# Altium PCB PCB_TDS.PcbDoc
Units mm, origin at the board's own origin, x right, y up, seen from the top; angles counter-clockwise.
Board outline 12.37 x 15.65 mm, 2 copper layers (Top Layer, Bottom Layer), stack 1.448 mm thick; 10 components, 8 nets, 26 pads, 47 vias.
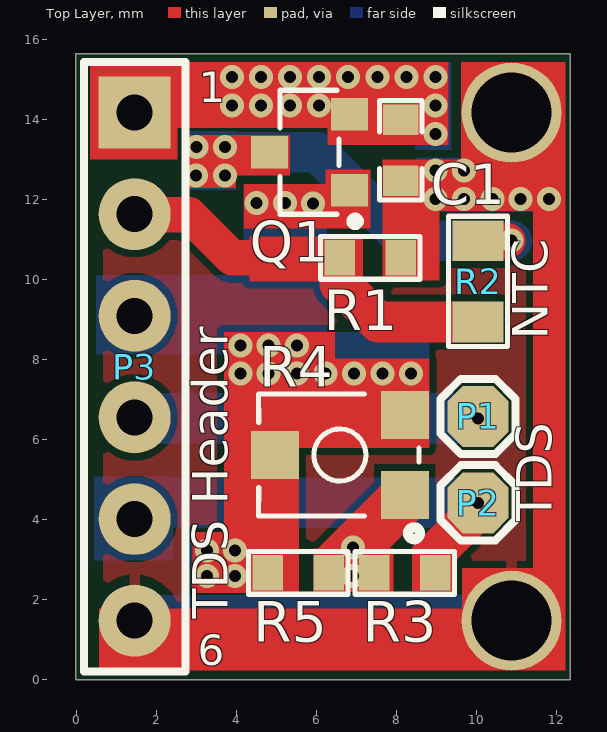
[diagram p0: Top Layer view]
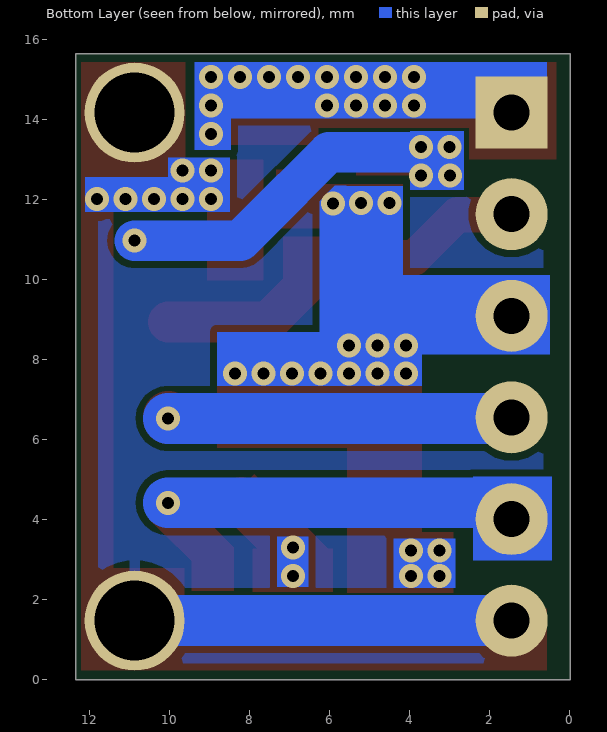
[diagram p1: Bottom Layer view, seen from below]
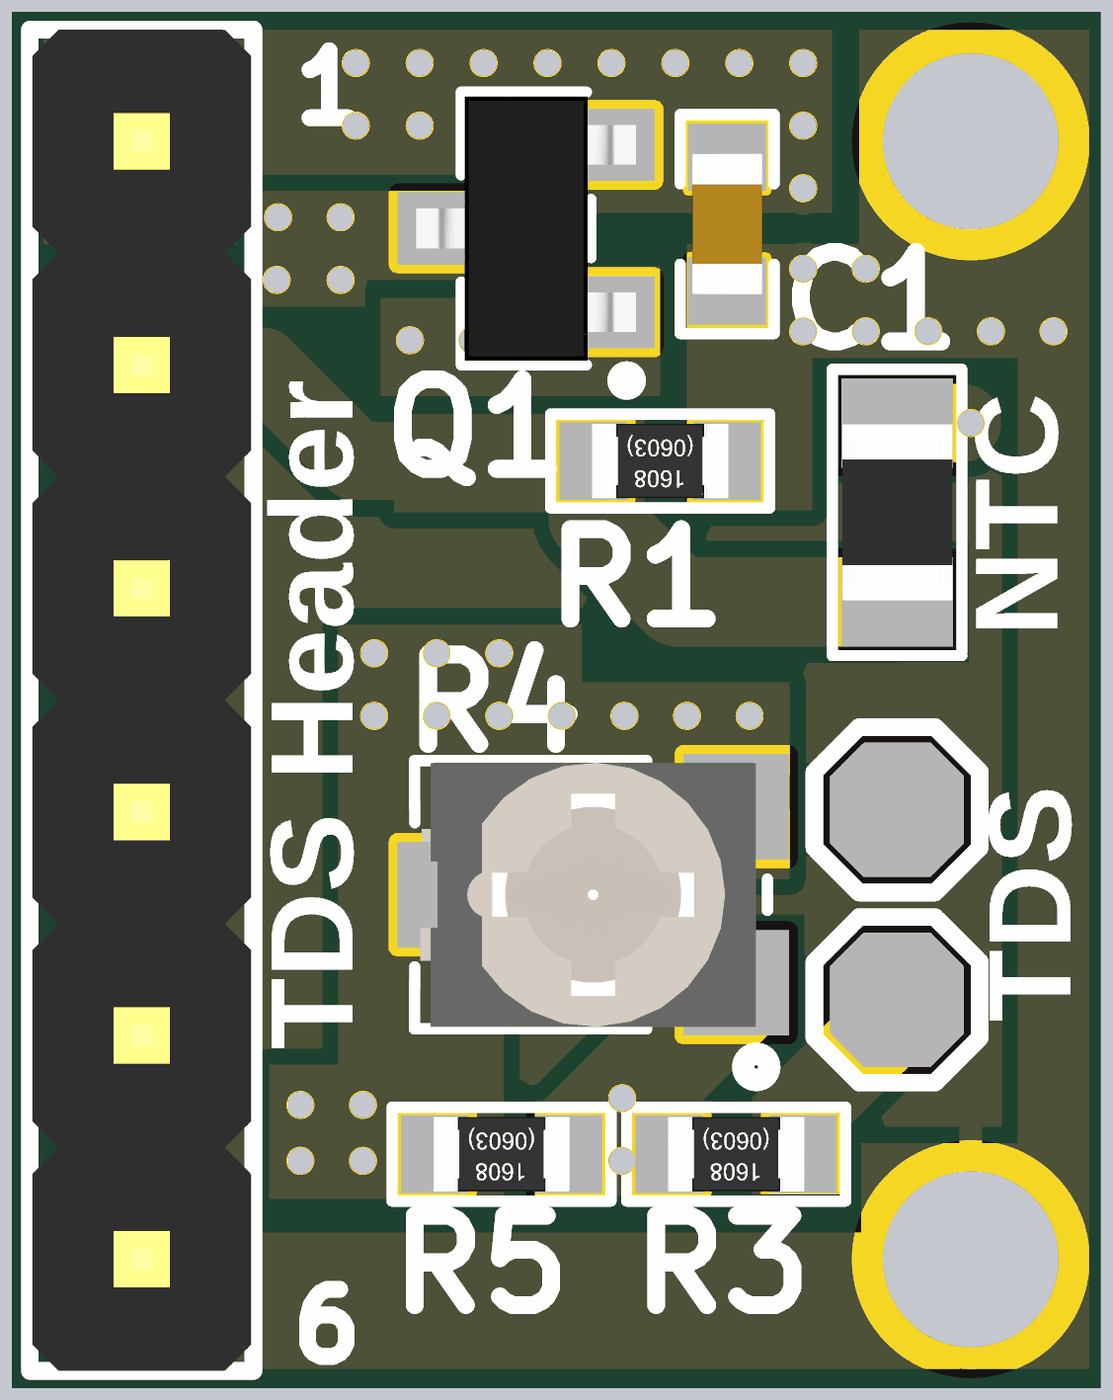
[diagram p2: 3D render of the assembled board from above, using the file's embedded part models]

## Layer stack, top to bottom
Top Solder: solder mask 0.0762, Solder Resist, Dk 3.5
Top Layer: signal copper 0.254
Dielectric 1: dielectric 0.9398, FR-4, Dk 4.8
Bottom Layer: signal copper 0.254
Bottom Solder: solder mask 0.0762, Solder Resist, Dk 3.5

## Board outline
-0.025,0 -0.025,15.646 12.344,15.646 12.344,0

## Design rules (kind name [scope] priority, off if disabled: settings)
Clearance [All] p1: gap=0.178 ignorepadtopadclearanceinfootprint=FALSE
ComponentClearance [All] p1: gap=0 collisioncheckmode=3 verticalgap=0 showdistances=FALSE
HoleSize [All] p1: absolutevalues=TRUE maxlimit=25.4 minlimit=0.025 maxpercent=80.000 minpercent=20.000
HoleToHoleClearance [All] p1: gap=0 allowstackedmicrovias=TRUE
MinimumSolderMaskSliver [All] p1: minsoldermaskwidth=0
PolygonConnect [All] p1: connectstyle=Relief reliefconductorwidth=0.254 reliefentries=4 polygonreliefangle="90 Angle" airgapwidth=0.254
RoutingVias [All] p1: holewidth=0.3 width=0.6 viastyle="Through Hole" minholewidth=0.3 minwidth=0.6 maxholewidth=0.3 maxwidth=0.6
SilkToSilkClearance [All] p1: silktosilkclearance=0
SilkToSolderMaskClearance [IsPad] p1: minsilkscreentomaskgap=0 clearancetoexposedcopper=TRUE
SolderMaskExpansion [All] p1: expansion=0.102 istentingtop=FALSE
Width [All] p1: maxlimit=1.27 minlimit=0.254 preferedwidth=0.508 minimp=50.000000 maximp=50.000000 favimp=50.000000
24 further rules are at their usual default settings.

## Components (designator, comment, footprint, x,y, rotation, side; value= is the part's Value field where it differs from the comment)
C1 "0.1uF" Cap0603 8.103,13.233 r270 top locked
P1 "Test Point" "TEST POINT" 10.033,6.579 r0 top
P2 "Test Point" "TEST POINT" 10.033,4.42 r0 top
P3 "61300611121" HDR1X6 1.448,14.173 r270 top locked
Q1 "IRLML6402TRPBF" SOT-23 5.817,13.183 r90 top locked
R1 "15K" RES-0603 7.341,10.541 r0 top
R2 "10k" NCP21XV103J03RA 10.033,9.957 r90 top
R3 "1K" RES-0603 8.204,2.667 r0 top
R4 "2K" VG039NCHXTB202 6.579,5.613 r90 top locked
R5 "1K" RES-0603 5.537,2.667 r0 top

## Footprints (in the part's own frame and the unit in brackets; to place one, negate y for a bottom-side part, rotate by r counter-clockwise, add the part's x,y. Pads: shape width x height; smd on the part's side, far side on the other; paste and mask are expansions set on the pad)
Cap0603 [mil]
  rect 30x35 smd mask+2.36: 1(-30,0) 2(30,0)
  silkscreen extent -49,-21 49,21, body extent -32,-16 31,16, height 34
HDR1X6 [mm] "Connector; Header; 6 Position"
  rect 1.8x1.8 hole 0.9: 1(0,0)
  round 1.8 hole 0.9: 2(2.54,0) 3(5.08,0) 4(7.62,0) 5(10.16,0) 6(12.7,0)
  silkscreen extent -1.27,-1.27 13.97,1.27, body extent -1.27,-1.24 13.97,1.25, height 8.54
NCP21XV103J03RA [mil]
  rect 40x50 smd: 1(-40,0) 2(40,0)
  silkscreen extent -64,-29 64,29, body extent -39,-25 39,24, height 24
RES-0603 [mil]
  rect 30x35 smd: 1(-30,0) 2(30,0)
  silkscreen extent -49,-21 49,21, body extent -31,-17 31,17, height 18
SOT-23 [mm] "TRANS NPN 40V 0.6A SOT23"
  rect 0.82x0.92 smd: 1(-0.95,-1) 2(0.95,-1) 3(0,1)
  silkscreen extent -1.82,-1.23 1.55,0.74, body extent -1.5,-1.25 1.5,1.25, height 1.1
"TEST POINT" [mil]
  oct 60x60 smd: 1(0,0)
  silkscreen extent -37,-37 37,37
VG039NCHXTB202 [mm]
  rect 1.2x1.2 smd: 1(-1,-1.625) 2(0,1.625) 3(1,-1.625)
  silkscreen extent -2.1,-2 1.52,2.03, body extent -1.5,-1.95 1.5,1.96, height 1.1

## Part data
C1: library part CC0603ZRY5V9BB104, "CAP CER 0.1UF 50V Y5V 0603", Capacitance=100nF, Case Code (Imperial)=0603, Case Code (Metric)=1608, Dielectric=Y5V, Manufacturer=Yageo, Max Operating Temperature=85°C, Min Operating Temperature=-30°C, Package Quantity=1, Supplier Part Number 1=311-1343-1-ND, Tolerance=80%, Voltage=50V, Case/Package=0603, ComponentLink1Description=http://www.yageo.com/documents/recent/UPY-GPHC_Y5V_6.3V-to-50V_8.pdf?src-supplier=Digi-Key, ComponentLink1URL=http://www.yageo.com/documents/recent/UPY-GPHC_Y5V_6.3V-to-50V_8.pdf?src-supplier=Digi-Key, ComponentLink2Description=http://www.yageo.com/documents/recent/UPY-GPHC_Y5V_6.3V-to-50V_5.pdf?src-supplier=Avnet+Europe, ComponentLink2URL=http://www.yageo.com/documents/recent/UPY-GPHC_Y5V_6.3V-to-50V_5.pdf?src-supplier=Avnet+Europe, ComponentLink3Description=https://www.verical.com/server-webapp/html/getDatasheet?partID=403611&src-supplier=Verical, ComponentLink3URL=https://www.verical.com/server-webapp/html/getDatasheet?partID=403611&src-supplier=Verical, ComponentLink4Description=http://www.mouser.com/ds/2/447/Yageo_UPY-GP_NP0_16V-to-50V_9-358835.pdf?src-supplier=Mouser, ComponentLink4URL=http://www.mouser.com/ds/2/447/Yageo_UPY-GP_NP0_16V-to-50V_9-358835.pdf?src-supplier=Mouser, ComponentLink5Description=http://www.farnell.com/datasheets/1132289.pdf?src-supplier=Element14, ComponentLink5URL=http://www.farnell.com/datasheets/1132289.pdf?src-supplier=Element14, Composition=Ceramic, Depth=0.8mm, Halogen Free="Halogen Free", Height=0.8mm, Lead Free="Lead Free", Length=1.6mm, Manufacturer Part Number=CC0603ZRY5V9BB104, Mount="Surface Mount", Number of Pins=2, Packaging="Tape and Reel", Pricing 1="1=0.1, 10=0.075, 100=0.0334, 500=0.02386, 1000=0.01874 (USD)", Radiation Hardening=No, REACH SVHC="No SVHC", Stock 1=15000880, Supplier 1=Digi-Key, Termination=SMD/SMT, Thickness=0.035inch, Voltage Rating=50V, Voltage Rating (DC)=50V, Width=0.031inch
P1 P2: library part "TEST POINT", "Test Point ON"
P3: library part "Header 1x6", "CONN HEADER VERT 6POS 2.54MM", Color=Black, Current Rating=3A, Manufacturer="Wurth Electronics", Max Operating Temperature=125°C, Min Operating Temperature=-40°C, Supplier Part Number 1=732-5319-ND, Voltage Rating=250V, ComponentLink1Description=http://www.farnell.com/cad/1737268.pdf?src-supplier=Element14, ComponentLink1URL=http://www.farnell.com/cad/1737268.pdf?src-supplier=Element14, ComponentLink2Description=https://katalog.we-online.de/em/datasheet/6130xx11121.pdf?src-supplier=Digi-Key, ComponentLink2URL=https://katalog.we-online.de/em/datasheet/6130xx11121.pdf?src-supplier=Digi-Key, ComponentLink3Description=http://www.mouser.com/ds/2/445/6130xx11121-538006.pdf?src-supplier=Mouser, ComponentLink3URL=http://www.mouser.com/ds/2/445/6130xx11121-538006.pdf?src-supplier=Mouser, Connector Type="Male Pin", Contact Gender=Male, Contact Material="Copper Alloy,Copper", Contact Mating Length=0.236inch, Contact Plating=Gold, Gender=Male, Housing Material=PBT, Lead Free="Lead Free", Manufacturer Part Number=61300611121, Mount="Through Hole", Number of Contacts=6, Number of Positions=6, Number of Rows=1, Packaging=Bulk, Pitch=0.1inch, Pricing 1="1=0.33, 10=0.279, 25=0.232, 50=0.194, 100=0.176, 1000=0.16 (USD)", REACH SVHC=Unknown, Stock 1=14573, Supplier 1=Digi-Key, Termination="Through Hole"
Q1: "MOSFET P-CH 20V 3.7A SOT23", Case/Package=SOT-23, Continuous Drain Current (ID)=3.7A, Current Rating=-3.7A, Drain to Source Breakdown Voltage=-20V, Drain to Source Resistance=65mR, Drain to Source Voltage (Vdss)=20V, Gate to Source Voltage (Vgs)=12V, Input Capacitance=633pF, Manufacturer="International Rectifier", Max Operating Temperature=150°C, Max Power Dissipation=1.3W, Min Operating Temperature=-55°C, Package Quantity=1, Supplier Part Number 1=06X2796, Threshold Voltage=-550mV, Category=MOSFETs, ComponentLink1Description=https://datasheet.ciiva.com/7799/13209-7799017.pdf?src-supplier=Element14, ComponentLink1URL=https://datasheet.ciiva.com/7799/13209-7799017.pdf?src-supplier=Element14, ComponentLink2Description=https://datasheet.ciiva.com/34302/1563729-34302500.pdf?src-supplier=Jameco, ComponentLink2URL=https://datasheet.ciiva.com/34302/1563729-34302500.pdf?src-supplier=Jameco, ComponentLink3Description=https://datasheet.ciiva.com/28515/irlml6402pbf-28515795.pdf?src-supplier=Element14, ComponentLink3URL=https://datasheet.ciiva.com/28515/irlml6402pbf-28515795.pdf?src-supplier=Element14, ComponentLink4Description=https://datasheet.ciiva.com/7333/irlml6402-7333200.pdf?src-supplier=Newark, ComponentLink4URL=https://datasheet.ciiva.com/7333/irlml6402-7333200.pdf?src-supplier=Newark, ComponentLink5Description=https://datasheet.ciiva.com/29326/162833-da-01-en-irlml-6402tr-29326798.pdf?src-supplier=Conrad, ComponentLink5URL=https://datasheet.ciiva.com/29326/162833-da-01-en-irlml-6402tr-29326798.pdf?src-supplier=Conrad, ComponentLink6Description=https://datasheet.ciiva.com/7799/13209-7799018.pdf?src-supplier=Element14, ComponentLink6URL=https://datasheet.ciiva.com/7799/13209-7799018.pdf?src-supplier=Element14, ComponentLink7Description=https://datasheet.ciiva.com/936/irlml6402pbf-936987.pdf?src-supplier=Digi-Key, ComponentLink7URL=https://datasheet.ciiva.com/936/irlml6402pbf-936987.pdf?src-supplier=Digi-Key, ComponentLink8Description=https://datasheet.ciiva.com/936/irlml6402pbf-936988.pdf?src-supplier=Digi-Key, ComponentLink8URL=https://datasheet.ciiva.com/936/irlml6402pbf-936988.pdf?src-supplier=Digi-Key, ComponentLink9Description=https://datasheet.ciiva.com/16311/irlml6402pbf-16311535.pdf?src-supplier=Future+Electronics, ComponentLink9URL=https://datasheet.ciiva.com/16311/irlml6402pbf-16311535.pdf?src-supplier=Future+Electronics, Drain-source On Resistance-Max=65mR, Dual Supply Voltage=-20V, Element Configuration=Single, Fall Time=381ns, Height=1.02mm, Lead Free="Lead Free", Length=3.04mm, Manufacturer Part Number=IRLML6402TRPBF, Mount="Surface Mount", Nominal Vgs=-550mV, Number of Elements=1, Number of Pins=3, On-State Resistance=65mR, Packaging="Tape and Reel", Power Dissipation=1.3W, Radiation Hardening=No, Rds On Max=65mR, REACH SVHC="No SVHC", Rise Time=48ns, RoHS=Yes, RoHS Compliant=Yes, Series=HEXFET®, Supplier 1=Newark, Termination=SMD/SMT, Turn-Off Delay Time=588ns, Turn-On Delay Time=350ns, Voltage Rating (DC)=-20V, Width=1.4mm
R1: library part RC0603FR-0715KL, "RES SMD 15K OHM 1% 1/10W 0603", Case Code (Imperial)=0603, Case Code (Metric)=1608, Manufacturer=Yageo, Max Operating Temperature=155°C, Max Power Dissipation=100mW, Min Operating Temperature=-55°C, Package Quantity=1, Resistance=15kR, Supplier Part Number 1=311-15.0KHRCT-ND, Temperature Coefficient=100ppm/°C, Tolerance=1%, Voltage Rating=50V, Case/Package=0603, ComponentLink1Description=http://www.yageo.com/documents/recent/PYu-RC_Group_51_RoHS_L_10.pdf?src-supplier=Digi-Key, ComponentLink1URL=http://www.yageo.com/documents/recent/PYu-RC_Group_51_RoHS_L_10.pdf?src-supplier=Digi-Key, ComponentLink2Description=http://www.yageo.com/documents/recent/PYu-RC_Group_51_RoHS_L_9.pdf?src-supplier=Digi-Key, ComponentLink2URL=http://www.yageo.com/documents/recent/PYu-RC_Group_51_RoHS_L_9.pdf?src-supplier=Digi-Key, ComponentLink3Description=https://www.verical.com/server-webapp/html/getDatasheet?partID=327895&src-supplier=Verical, ComponentLink3URL=https://www.verical.com/server-webapp/html/getDatasheet?partID=327895&src-supplier=Verical, Composition="Thick Film", Depth=0.8mm, Features="Moisture Resistant", Height=0.022inch, Lead Free="Lead Free", Length=1.6mm, Manufacturer Part Number=RC0603FR-0715KL, Military Standard=Not, Number of Pins=2, Number of Terminations=2, Packaging="Tape and Reel", Power Rating=100mW, Pricing 1="1=0.1, 10=0.023, 100=0.0094, 1000=0.00421, 2500=0.00366 (USD)", REACH SVHC=Unknown, Stock 1=6469942, Supplier 1=Digi-Key, Termination=SMD/SMT, Voltage Rating (DC)=50V, Width=0.031inch
R2: library part NCP21XV103J03RA, "THERMISTOR NTC 10KOHM 3900K 0805", Case Code (Imperial)=0805, Case Code (Metric)=2012, Current Rating=440uA, Manufacturer=Murata, Max Operating Temperature=125°C, Max Power Dissipation=200mW, Min Operating Temperature=-40°C, Package Quantity=4000, Resistance=10kR, Resistance Tolerance=5%, Accuracy=3%, Case/Package=0805, Category=Thermistors, ComponentLink1Description=https://datasheet.ciiva.com/11822/0900766b807f1e39-11822071.pdf?src-supplier=RSComponents, ComponentLink1URL=https://datasheet.ciiva.com/11822/0900766b807f1e39-11822071.pdf?src-supplier=RSComponents, ComponentLink2Description=https://datasheet.ciiva.com/2848/r44e-2848542.pdf?src-supplier=Digi-Key, ComponentLink2URL=https://datasheet.ciiva.com/2848/r44e-2848542.pdf?src-supplier=Digi-Key, ComponentLink3Description=https://datasheet.ciiva.com/2848/r44e-2848541.pdf?src-supplier=Digi-Key, ComponentLink3URL=https://datasheet.ciiva.com/2848/r44e-2848541.pdf?src-supplier=Digi-Key, ComponentLink4Description=https://datasheet.ciiva.com/2848/r44e-2848543.pdf?src-supplier=Digi-Key, ComponentLink4URL=https://datasheet.ciiva.com/2848/r44e-2848543.pdf?src-supplier=Digi-Key, ComponentLink5Description=https://datasheet.ciiva.com/3280/l0770e-3280681.pdf?src-supplier=Avnet, ComponentLink5URL=https://datasheet.ciiva.com/3280/l0770e-3280681.pdf?src-supplier=Avnet, ComponentLink6Description=https://datasheet.ciiva.com/17993/getdatasheetpartid-189606-17993259.pdf?src-supplier=Verical, ComponentLink6URL=https://datasheet.ciiva.com/17993/getdatasheetpartid-189606-17993259.pdf?src-supplier=Verical, ComponentLink7Description=https://datasheet.ciiva.com/3280/l0770e-3280359.pdf?src-supplier=Avnet, ComponentLink7URL=https://datasheet.ciiva.com/3280/l0770e-3280359.pdf?src-supplier=Avnet, Depth=1.25mm, Height=0.85mm, Lead Free="Lead Free", Length=2mm, Manufacturer Part Number=NCP21XV103J03RA, Mount="Surface Mount", Number of Pins=2, Packaging="Tape and Reel", Power Rating=200mW, Pricing 1="4000=0.06120, 8000=0.05948, 16000=0.05775, 24000=0.05603, 32000=0.05431 (USD)", Radiation Hardening=No, REACH SVHC="No SVHC", RoHS=Yes, RoHS Compliant=Yes, Series=NCP, Stock 1=112000, Supplier 1=Avnet, Supplier Part Number 1=NCP21XV103J03RA, Termination=SMD/SMT, Thickness=150um, Tolerance=5%
R3 R5: library part RC0603FR-071KL, "RES SMD 1K OHM 1% 1/10W 0603", Case Code (Imperial)=0603, Case Code (Metric)=1608, Manufacturer=Yageo, Max Operating Temperature=155°C, Min Operating Temperature=-55°C, Power Rating=100mW, Resistance=1kR, Supplier Part Number 1=311-1.00KHRDKR-ND, Temperature Coefficient=100ppm/°C, Tolerance=1%, Voltage Rating=50V, Case/Package=0603, ComponentLink1Description=https://www.verical.com/server-webapp/html/getDatasheet?partID=409289&src-supplier=Verical, ComponentLink1URL=https://www.verical.com/server-webapp/html/getDatasheet?partID=409289&src-supplier=Verical, ComponentLink2Description=http://documents.rs-components.com/techlib://itc_doclist_GB.htm?stockno=5048928&src-supplier=RSComponents, ComponentLink2URL=http://documents.rs-components.com/techlib://itc_doclist_GB.htm?stockno=5048928&src-supplier=RSComponents, ComponentLink3Description=http://www.yageo.com/documents/recent/PYu-RC0603_51_RoHS_L_4.pdf?src-supplier=Avnet+Europe, ComponentLink3URL=http://www.yageo.com/documents/recent/PYu-RC0603_51_RoHS_L_4.pdf?src-supplier=Avnet+Europe, ComponentLink4Description=http://www.farnell.com/datasheets/2167052.pdf?src-supplier=Element14, ComponentLink4URL=http://www.farnell.com/datasheets/2167052.pdf?src-supplier=Element14, ComponentLink5Description=http://www.farnell.com/datasheets/1868787.pdf?src-supplier=Element14, ComponentLink5URL=http://www.farnell.com/datasheets/1868787.pdf?src-supplier=Element14, ComponentLink6Description=http://www.yageo.com/documents/recent/PYu-RC_Group_51_RoHS_L_2.pdf?src-supplier=Avnet, ComponentLink6URL=http://www.yageo.com/documents/recent/PYu-RC_Group_51_RoHS_L_2.pdf?src-supplier=Avnet, ComponentLink7Description=https://www.verical.com/server-webapp/html/getDatasheet?partID=404327&src-supplier=Verical, ComponentLink7URL=https://www.verical.com/server-webapp/html/getDatasheet?partID=404327&src-supplier=Verical, ComponentLink8Description=http://www.farnell.com/datasheets/443971.pdf?src-supplier=Element14, ComponentLink8URL=http://www.farnell.com/datasheets/443971.pdf?src-supplier=Element14, Composition="Thick Film", Contact Plating=Tin,Matte, Depth=0.8mm, Height=0.45mm, Lead Free="Lead Free", Length=1.6mm, Manufacturer Part Number=RC0603FR-071KL, Military Standard=Not, Packaging="Tape and Reel", Pricing 1="1=0.1, 10=0.023, 100=0.0094, 1000=0.0042, 2500=0.0037 (USD)", Radiation Hardening=No, REACH SVHC="No SVHC", Stock 1=21472395, Supplier 1=Digi-Key, Termination=SMD/SMT
R4: library part VG039NCHXTB202, "±250ppm/℃ ±25% 2kΩ SMD Variable Resistors/Potentiometers ROHS", Manufacturer=HDK, ComponentLink1Description=LCSC, ComponentLink1URL=https://www.lcsc.com/product-detail/Variable-Resistors-Potentiometers_HDK-Hokuriku-Elec-Industry-VG039NCHXTB202_C128549.html, Manufacturer Part No=VG039NCHXTB202

## Free pads (board coordinates)
  round 2.5 hole 2: MH1(10.871,14.173) MH2(10.871,1.473)

## Via types
v1: diameter 0.6, hole 0.3, Top Layer to Bottom Layer, 44 vias
v2: diameter 0.6, hole 0.3, Top Layer to Bottom Layer, tented both sides, 3 vias

## Nets (pads, with @x,y where several pads share a name; then routed paths per layer and width w, separated by ;. In a path a pad name is that pad's centre, name@x,y a point inside that pad or via, vN(x,y) a via of type N, cw(c..) or ccw(c..) an arc to the next point about the centre after c; other vN are vias at no path point)
3V3: C1.1 P3.1 Q1.2 | length 2
  Top Layer w0.635: Q1.2@6.765,14.173 6.879,14.059 C1.1@8.103,14.059
  Bottom Layer w0.635: P3.1@1.709,13.912 P3.1 1.473,14.199 P3.1@1.709,14.199
  other v1: 8.966,13.64 3.881,14.351 4.608,14.351 5.334,14.351 6.06,14.351 8.966,14.351 3.881,15.062 4.608,15.062 5.334,15.062 6.06,15.062 6.787,15.062 7.513,15.062 8.24,15.062 8.966,15.062
AN10: P3.2 R1.1 R2.1 | length 10.1
  Top Layer w0.889: P3.2 1.465,11.616 2.811,11.616 3.886,10.541 R1.1
  Top Layer w1.016: R1.1 6.579,9.9 7.537,8.941 R2.1
AN11: P2.1 P3.5 R3.2 | length 8.9
  Top Layer w0.635: P3.5 P3.5@1.537,3.924
  Bottom Layer w1.143: P3.5 1.626,4.013 P3.5@2.032,4.42
  Bottom Layer w1.27: P3.5@2.032,4.42 v2(10.033,4.42)
GND: C1.2 P3.6 pad.MH1 pad.MH2 R1.2 | length 13.4
  Top Layer w0.635: pad.MH1 10.871,12.662 11.062,12.471 11.328,12.471
  Top Layer w0.889: R1.2 C1.2
  Bottom Layer w0.635: P3.6 P3.6@1.46,1.46
  Bottom Layer w1.27: P3.6 pad.MH2
  other v1: 8.966,12.014 9.677,12.014 10.389,12.014 11.1,12.014 11.811,12.014 8.966,12.725 9.677,12.725
NetQ1_3: Q1.3 R2.2 | length 9.4
  Top Layer w0.635: Q1.3@4.791,13.157 Q1.3 Q1.3@4.791,13.208
  Top Layer w0.889: R2.2 v2@10.77,10.973
  Bottom Layer w1.016: v1@3.175,13.183 3.886,13.183 6.02,13.183 7.798,11.405 7.798,11.4 8.2,10.998 8.204,10.998 8.23,10.973 v2(10.871,10.973)
  other v1: 2.982,12.598 3.708,12.598 2.997,13.31 3.708,13.31
NetR3_1: R3.1 R4.1 R5.2 | length 0.3
  Top Layer w0.889: R4.1@7.963,4.458 8.048,4.458 R4.1
  other v1: 6.909,2.591 6.909,3.302
TDS_1: P1.1 P3.4 | length 8.6
  Top Layer w1.27: v2(10.033,6.528) P1.1
  Bottom Layer w1.27: P3.4 1.473,6.528 v2(10.033,6.528)
TDS_2: P3.3 Q1.1 R4.2 R4.3 R5.1 | length 4.8
  Top Layer w0.635: R5.1 4.839,2.73 4.839,5.499 R4.2 R4.2@5.236,5.896 ; 6.817,6.613 R4.3
  other v1: 3.251,2.591 3.962,2.591 3.251,3.226 3.962,3.226 4.089,7.645 4.801,7.645 5.512,7.645 6.223,7.645 6.934,7.645 7.645,7.645 8.357,7.645 4.089,8.357 4.801,8.357 5.512,8.357 4.496,11.913 5.208,11.913 5.907,11.901

## Polygon pours and split planes (outlines as drawn)
GND on Bottom Layer "GND_L02_P002" (solid, pour order 2): 0.66,15.24 11.786,15.24 11.786,0.406 0.66,0.406
GND on Top Layer "GND_L01_P003" (solid, pour order 3): 0.66,15.24 11.786,15.24 11.786,0.406 0.66,0.406

## Other copper
Top Layer:
  region net NetQ1_3: 3.988,13.614 2.743,13.614 2.743,12.295 3.988,12.295
  rectangle net TDS_2: 2.896,2.159 5.55,3.683
  rectangle net TDS_2: 3.683,7.163 6.452,8.687
  region net NetR3_1: 7.925,2.184 7.925,3.277 5.918,3.277 5.918,2.184
  region net AN11: 8.386,3.306 8.386,2.21 9.449,2.21 9.449,3.306
  region net AN11: 10.516,4.013 9.804,4.724 8.386,3.306 9.097,2.594
  region net NetR3_1: 8.788,4.242 7.887,5.144 6.007,3.264 6.909,2.362
  region net AN10: 7.163,9.957 7.163,11.074 4.318,11.074 4.318,9.957
  region net NetQ1_3: 5.334,12.598 5.334,13.614 2.743,13.614 2.743,12.598
  region net TDS_2: 7.341,11.278 7.341,12.395 4.166,12.395 4.166,11.278
  rectangle net TDS_2: 6.223,11.354 7.341,12.751
  rectangle net GND: 9.627,0.356 12.217,2.794
  region net GND: 12.217,1.778 0.559,1.778 0.559,0.229 12.217,0.229
  region net GND: 12.217,0.305 12.217,12.141 11.405,12.141 11.405,0.305
  region net TDS_2: 5.563,2.159 5.563,8.687 3.683,8.687 3.683,2.159
  rectangle net TDS_2: 4.343,5.791 8.814,8.026
  region net GND: 9.068,9.982 9.068,12.979 7.645,12.979 7.645,9.982
  rectangle net GND: 9.601,11.709 12.217,15.443
  rectangle net GND: 7.645,11.709 12.116,13.005
  rectangle net 3V3: 2.438,13.792 6.604,15.443
  rectangle net 3V3: 0.33,13.005 2.515,15.443
  rectangle net 3V3: 6.274,13.36 9.296,15.443
Bottom Layer:
  rectangle net NetR3_1: 6.528,2.311 7.315,3.581
  rectangle net NetQ1_3: 2.642,12.243 3.988,13.716
  rectangle net TDS_2: 4.166,8.357 5.607,12.344
  rectangle net AN11: 0.432,2.972 2.413,5.08
  rectangle net TDS_2: 2.845,2.286 4.394,3.531
  rectangle net TDS_2: 3.683,7.341 8.814,8.687
  rectangle net TDS_2: 0.483,8.128 5.537,10.109
  rectangle net GND: 9.525,11.684 12.116,12.567
  rectangle net 3V3: 8.458,13.233 9.373,14.605
  rectangle net GND: 8.484,11.684 10.033,13.056
  rectangle net 3V3: 0.559,14.021 9.373,15.443
  region net TDS_2: 5.58,12.344 5.867,12.344 6.248,11.963 6.248,8.407 5.517,7.676

## Silkscreen, mask and mechanical layers (free items; w line width, h text height)
Top Overlay:
  text "1" at 3.048,14.427 h0.76
  text "NTC" at 12.079,8.489 h1.52 r90
  text "TDS" at 12.182,3.962 h1.52 r90
  text "TDS Header" at 4.073,1.524 h1.52 r90
  text "6" at 3.023,0.356 h0.76
Board Outline:
  the board outline again, w0.254

## Dimensions
12.344,0 to -0.025,0 on Draft and Dimension
-0.025,15.646 to -0.025,0 on Draft and Dimension